# Altium PCB DT10966_MOTOR_CONTROLLER.PcbDoc (part 6 of 8)
Units mm, origin at the board's own origin, x right, y up, seen from the top; angles counter-clockwise.
Board outline 300 x 19 mm, 10 copper layers (Top Layer, Layer 2 GND, Layer 3 SIG, Layer 4 GND, Layer 5 PWR, Layer 6 PWR, Layer 7 GND, Layer 8 SIG, Layer 9 GND, Bottom Layer), stack 2.418 mm thick; 745 components, 446 nets, 2132 pads, 1222 vias.
Unrouted connection lines stored in the file: 3.
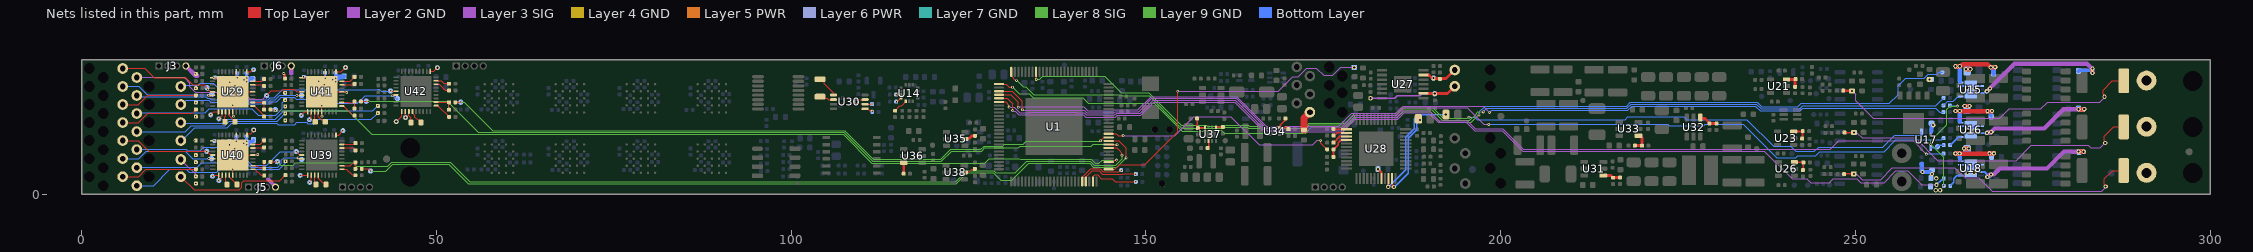
[diagram p13: the nets of this part, all layers, seen from the top]

## Via types
v1: diameter 0.6, hole 0.3, Top Layer to Bottom Layer, tented both sides, 726 vias
v2: diameter 0.4, hole 0.2, Top Layer to Bottom Layer, tented both sides, 493 vias
v3: diameter 0.5, hole 0.2, Top Layer to Bottom Layer, tented both sides, 3 vias

## Nets (pads, with @x,y where several pads share a name; then routed paths per layer and width w, separated by ;. In a path a pad name is that pad's centre, name@x,y a point inside that pad or via, vN(x,y) a via of type N, cw(c..) or ccw(c..) an arc to the next point about the centre after c; other vN are vias at no path point) (continued)
NetR108_2: R108.2 U14.3 | length 0.7
  Top Layer w0.15: v2(114.792,14.056) 114.803,14.045 115.474,14.045 U14.3@115.485,14.035
NetR111_2: R111.2 U14.4 | length 0.8
  Top Layer w0.15: v2(114.842,13.067) 114.89,13.114 115.001,13.114 115.421,13.535 U14.4@115.485,13.535
NetR112_2: R112.2 U14.5 | length 2.1
  Top Layer w0.15: R112.2@114.653,11.785 115.332,12.464 115.564,12.464 116.153,13.053 U14.5@116.153,13.116
NetR114_1: R114.1 R119.1 R124.1 TP6.1 U17.4 | length 17.3
  Layer 8 SIG w0.127: v2(262.429,1.201) 262.429,5.221 v2(260.579,7.07) 260.579,7.573 262.822,9.816 262.822,11.965 263.297,12.44 v2(264.347,12.44)
  Bottom Layer w0.127: R114.1@263.271,12.523 264.19,12.523 264.273,12.44 v2(264.347,12.44)
  Bottom Layer w0.2: U17.4@260.579,6.595 261.366,6.595 261.709,6.938 R119.1@262.41,6.938
NetR114_2: R114.2 U15.6 | length 3
  Bottom Layer w0.127: R114.2@262.371,12.523 262.371,12.528 262.95,13.108 263.732,13.108 264.335,13.711 264.741,13.711 U15.6@264.805,13.774
NetR115_1: R115.1 U1.100 | length 138.7
  Top Layer w0.15: U1.100@131.011,17.262 131.011,16.687 131.585,16.113 131.707,16.113 v2(131.755,16.065)
  Layer 8 SIG w0.15: v2(131.755,16.065) 132.687,15.133 133.055,15.133 134.152,14.035 146.539,14.035 146.663,13.911 150.436,13.911 154.365,9.982 155.028,9.319 160.694,9.319 160.819,9.444 164.303,9.444 164.402,9.344 172.6,9.344 173.033,9.778 178.202,9.778 179.547,11.122 185.322,11.122 186.109,11.909 190.258,11.909 191.748,10.419 195.626,10.419 196.528,11.32 196.528,11.373 196.763,11.608 196.77,11.608 196.78,11.619 197.516,11.619 v2(197.52,11.615)
  Bottom Layer w0.15: v2(197.52,11.615) 198.02,12.114 217.767,12.114 218.376,12.723 235.992,12.723 236.666,12.05 242.112,12.05 242.526,12.464 261.273,12.464 262.129,13.32 262.177,13.32 262.382,13.525 R115.1@262.41,13.525
NetR116_1: R116.1 U15.4 | length 31.3
  Top Layer w0.2: v1(268.491,14.518) 268.526,14.518 268.913,14.906 v1(268.948,14.906)
  Top Layer w0.5: v1(283.369,17.714) 283.373,17.71 283.373,17.101 v1(283.377,17.097)
  Layer 2 GND w0.2: v1(268.491,14.518) 268.526,14.518 268.913,14.906 v1(268.948,14.906)
  Layer 2 GND w0.5: v1(283.369,17.714) 283.373,17.71 283.373,17.101 v1(283.377,17.097)
  Layer 9 GND w0.2: v1(268.491,14.518) 268.526,14.518 268.913,14.906 v1(268.948,14.906)
  Layer 9 GND w0.5: v1(283.369,17.714) 283.373,17.71 283.373,17.101 v1(283.377,17.097)
  Layer 5 PWR w0.2: v1(268.491,14.518) 268.526,14.518 268.913,14.906 v1(268.948,14.906)
  Layer 5 PWR w0.5: v1(283.369,17.714) 283.373,17.71 283.373,17.101 v1(283.377,17.097)
  Layer 6 PWR w0.2: v1(268.491,14.518) 268.526,14.518 268.913,14.906 v1(268.948,14.906)
  Layer 6 PWR w0.5: v1(283.369,17.714) 283.373,17.71 283.373,17.101 v1(283.377,17.097)
  Layer 4 GND w0.2: v1(268.491,14.518) 268.526,14.518 268.913,14.906 v1(268.948,14.906)
  Layer 4 GND w0.5: v1(283.369,17.714) 283.373,17.71 283.373,17.101 v1(283.377,17.097)
  Layer 7 GND w0.2: v1(268.491,14.518) 268.526,14.518 268.913,14.906 v1(268.948,14.906)
  Layer 7 GND w0.5: v1(283.369,17.714) 283.373,17.71 283.373,17.101 v1(283.377,17.097)
  Layer 3 SIG w0.6: v1(268.491,14.518) 268.879,14.906 v1(268.948,14.906) 268.948,14.977 272.38,18.409 282.589,18.409 283.284,17.714 v1(283.369,17.714) ; v1(283.377,17.097) 283.386,17.105 v1@283.386,17.697
  Layer 8 SIG w0.2: v1(268.491,14.518) 268.526,14.518 268.913,14.906 v1(268.948,14.906)
  Layer 8 SIG w0.5: v1(283.369,17.714) 283.373,17.71 283.373,17.101 v1(283.377,17.097)
  Bottom Layer w0.2: U15.4@267.65,14.274 267.677,14.301 268.166,14.301 268.383,14.518 v1(268.491,14.518)
  Bottom Layer w0.5: R116.1@281.406,17.372 281.516,17.482 283.11,17.482 283.342,17.714 v1(283.369,17.714) ; v1@283.369,17.133 v1@283.369,17.482
  Bottom Layer w0.6: v1(268.491,14.518) 268.561,14.518 v1(268.948,14.906)
NetR117_1: R117.1 U1.1 | length 142.2
  Top Layer w0.15: U1.1@129.286,15.537 130.301,15.537 130.751,15.087 v2(131.19,15.087)
  Layer 8 SIG w0.15: v2(131.19,15.087) 131.257,15.087 131.372,14.972 131.376,14.972 132.15,14.197 133.566,14.197 134.129,13.634 135.54,13.634 135.544,13.639 141.062,13.639 141.895,12.805 151.149,12.805 155.079,8.875 158.102,8.875 158.235,9.008 160.633,9.008 161.001,8.64 172.498,8.64 173.359,9.501 178.317,9.501 179.659,10.843 185.434,10.843 186.221,11.63 190.011,11.63 191.499,10.142 195.838,10.142 196.896,11.199 v2(196.926,11.199)
  Bottom Layer w0.15: v2(196.926,11.199) 196.961,11.235 196.961,11.624 197.787,12.45 217.711,12.45 218.262,13 236.114,13 236.787,12.327 241.87,12.327 242.349,12.806 254.73,12.806 255.978,14.054 255.978,15.334 257.033,16.389 259.653,16.389 260.226,16.962 261.499,16.962 261.72,17.183 262.2,17.183 R117.1@262.22,17.204
NetR118_1: R118.1 U15.10 | length 21.6
  Top Layer w0.6: v1(264.06,18.053) 264.064,18.057 264.672,18.057 v1(264.676,18.061) 264.799,18.061 265.088,18.35 268.597,18.35 v1(269.048,17.898) 269.076,17.927 v1(269.659,17.927)
  Layer 2 GND w0.6: v1(264.06,18.053) 264.668,18.053 v1(264.676,18.061) ; v1(269.048,17.898) 269.076,17.927 v1(269.659,17.927)
  Layer 9 GND w0.5: v1(269.048,17.898) 269.062,17.913 269.644,17.913 v1(269.659,17.927)
  Layer 9 GND w0.6: v1(264.06,18.053) 264.067,18.061 v1(264.676,18.061)
  Layer 5 PWR w0.5: v1(269.048,17.898) 269.062,17.913 269.644,17.913 v1(269.659,17.927)
  Layer 5 PWR w0.6: v1(264.06,18.053) 264.067,18.061 v1(264.676,18.061)
  Layer 6 PWR w0.5: v1(269.048,17.898) 269.062,17.913 269.644,17.913 v1(269.659,17.927)
  Layer 6 PWR w0.6: v1(264.06,18.053) 264.668,18.053 v1(264.676,18.061)
  Layer 4 GND w0.5: v1(269.048,17.898) 269.062,17.913 269.644,17.913 v1(269.659,17.927)
  Layer 4 GND w0.6: v1(264.06,18.053) 264.668,18.053 v1(264.676,18.061)
  Layer 7 GND w0.5: v1(269.048,17.898) 269.062,17.913 269.644,17.913 v1(269.659,17.927)
  Layer 7 GND w0.6: v1(264.06,18.053) 264.668,18.053 v1(264.676,18.061)
  Layer 3 SIG w0.5: v1(269.048,17.898) 269.062,17.913 269.644,17.913 v1(269.659,17.927)
  Layer 3 SIG w0.6: v1(264.06,18.053) 264.668,18.053 v1(264.676,18.061)
  Layer 8 SIG w0.5: v1(269.048,17.898) 269.062,17.913 269.644,17.913 v1(269.659,17.927)
  Layer 8 SIG w0.6: v1(264.06,18.053) 264.668,18.053 v1(264.676,18.061)
  Bottom Layer w0.2: U15.10@264.525,15.801 264.552,15.774 U15.10@264.805,15.774
  Bottom Layer w0.5: v1(269.048,17.898) 269.048,17.871 269.329,17.59 269.329,17.164 269.439,17.054 R118.1@269.439,16.999
  Bottom Layer w0.6: v1(264.06,18.053) 264.064,18.057 264.672,18.057 v1(264.676,18.061) 264.676,15.951 ; v1(269.048,17.898) 269.076,17.927 v1(269.659,17.927) 269.499,17.767 269.499,17.059 R118.1@269.439,16.999
NetR119_2: R119.2 U16.6 | length 2
  Bottom Layer w0.2: R119.2@263.31,6.938 264.447,8.075 264.778,8.075 U16.6@264.805,8.102
NetR120_1: R120.1 U1.3 | length 143
  Top Layer w0.15: U1.3@129.286,14.537 131.149,14.537 132.583,13.103 132.583,11.958 v2(132.616,11.925)
  Layer 3 SIG w0.127: v2(132.616,11.925) 132.657,11.884 141.272,11.884 141.682,11.474 145.528,11.474 145.732,11.678 149.001,11.678 150.843,13.52 162.699,13.52 166.864,9.354 177.501,9.354 179.292,11.145 185.293,11.145 185.623,11.476 185.627,11.476 186.323,12.172 195.286,12.172 197.603,9.855 v2(198.295,9.855)
  Bottom Layer w0.15: v2(198.295,9.855) 223.52,9.855 223.729,9.646 228.604,9.646 228.814,9.856 234.168,9.856 238.86,5.164 241.583,5.164 241.829,5.41 244.349,5.41 244.948,6.01 254.011,6.01 255.669,7.667 262.115,7.667 262.372,7.925 R120.1@262.401,7.925
NetR121_1: R121.1 U16.4 | length 29.3
  Top Layer w0.2: v1(268.518,8.642) 268.595,8.719 268.905,8.719 268.992,8.806 v1(269.1,8.806)
  Top Layer w0.6: v1(281.426,11.988) 282.205,11.988 v1(282.222,12.005)
  Layer 2 GND w0.6: v1(268.518,8.642) 268.681,8.806 v1(269.1,8.806) ; v1(281.426,11.988) 282.205,11.988 v1(282.222,12.005)
  Layer 9 GND w0.6: v1(268.518,8.642) 268.937,8.642 v1(269.1,8.806) ; v1(281.426,11.988) 282.205,11.988 v1(282.222,12.005)
  Layer 5 PWR w0.6: v1(268.518,8.642) 268.937,8.642 v1(269.1,8.806) ; v1(281.426,11.988) 281.443,12.005 v1(282.222,12.005)
  Layer 6 PWR w0.6: v1(268.518,8.642) 268.937,8.642 v1(269.1,8.806) ; v1(281.426,11.988) 282.205,11.988 v1(282.222,12.005)
  Layer 4 GND w0.6: v1(268.518,8.642) 268.937,8.642 v1(269.1,8.806) ; v1(281.426,11.988) 282.205,11.988 v1(282.222,12.005)
  Layer 7 GND w0.6: v1(268.518,8.642) 268.681,8.806 v1(269.1,8.806) ; v1(281.426,11.988) 282.205,11.988 v1(282.222,12.005)
  Layer 3 SIG w0.6: v1(268.518,8.642) 268.937,8.642 v1(269.1,8.806) 269.586,9.291 276.577,9.291 279.273,11.988 v1(281.426,11.988) 281.443,12.005 v1(282.222,12.005)
  Layer 8 SIG w0.6: v1(268.518,8.642) 268.937,8.642 v1(269.1,8.806) ; v1(281.426,11.988) 282.205,11.988 v1(282.222,12.005)
  Bottom Layer w0.2: U16.4@267.65,8.602 267.67,8.622 268.498,8.622 v1(268.518,8.642)
  Bottom Layer w0.6: v1(268.518,8.642) 268.937,8.642 v1(269.1,8.806) ; R121.1@281.406,12.13 281.406,12.008 v1(281.426,11.988) ; R121.1@281.413,12.123 281.531,12.005 v1(282.222,12.005)
NetR122_1: R122.1 U1.4 | length 139.6
  Top Layer w0.15: U1.4@129.286,14.037 130.942,14.037 131.973,13.006 131.973,12.303 v2(131.993,12.283)
  Layer 3 SIG w0.127: v2(131.993,12.283) 132.024,12.315 132.453,12.315 ; 132.454,12.315 132.778,12.315 ; 132.779,12.315 141.249,12.315 141.813,11.751 145.441,11.751 145.625,11.935 148.866,11.935 150.706,13.774 162.804,13.774 166.969,9.608 177.169,9.608 178.96,11.399 185.187,11.399 185.518,11.73 185.521,11.73 186.218,12.426 197.517,12.426 v2(198.382,11.56)
  Bottom Layer w0.15: v2(198.382,11.56) 198.449,11.56 198.708,11.819 217.864,11.819 218.491,12.446 235.871,12.446 236.544,11.773 242.227,11.773 242.567,12.113 261.319,12.113 261.847,11.585 R122.1@262.372,11.585
NetR123_1: R123.1 U16.10 | length 19.8
  Top Layer w0.6: v1(264.065,11.76) v1(264.679,11.76) ; v1@264.679,11.742 264.701,11.72 268.582,11.72 v1(268.588,11.726) v1@269.221,11.726
  Layer 2 GND w0.3: v1(268.588,11.726) 268.6,11.738 269.209,11.738 v1(269.221,11.751)
  Layer 2 GND w0.6: v1(264.065,11.76) v1(264.679,11.76)
  Layer 9 GND w0.3: v1(268.588,11.726) 268.6,11.738 269.209,11.738 v1(269.221,11.751)
  Layer 9 GND w0.6: v1(264.065,11.76) v1(264.679,11.76)
  Layer 5 PWR w0.3: v1(268.588,11.726) 268.6,11.738 269.209,11.738 v1(269.221,11.751)
  Layer 5 PWR w0.6: v1(264.065,11.76) v1(264.679,11.76)
  Layer 6 PWR w0.3: v1(268.588,11.726) 268.6,11.738 269.209,11.738 v1(269.221,11.751)
  Layer 6 PWR w0.6: v1(264.065,11.76) v1(264.679,11.76)
  Layer 4 GND w0.3: v1(268.588,11.726) 268.6,11.738 269.209,11.738 v1(269.221,11.751)
  Layer 4 GND w0.6: v1(264.065,11.76) v1(264.679,11.76)
  Layer 7 GND w0.3: v1(268.588,11.726) 268.6,11.738 269.209,11.738 v1(269.221,11.751)
  Layer 7 GND w0.6: v1(264.065,11.76) v1(264.679,11.76)
  Layer 3 SIG w0.3: v1(268.588,11.726) 268.6,11.738 269.209,11.738 v1(269.221,11.751)
  Layer 3 SIG w0.6: v1(264.065,11.76) v1(264.679,11.76)
  Layer 8 SIG w0.3: v1(268.588,11.726) 268.6,11.738 269.209,11.738 v1(269.221,11.751)
  Layer 8 SIG w0.6: v1(264.065,11.76) v1(264.679,11.76)
  Bottom Layer w0.3: v1(269.221,11.751) v1@269.217,11.746 ; v1@269.217,11.746 269.166,11.696 269.166,11.009 R123.1@269.112,10.955 268.92,11.146 268.92,11.458 268.653,11.726 v1(268.588,11.726) 268.608,11.746 v1@269.217,11.746
  Bottom Layer w0.6: v1(264.065,11.76) v1(264.679,11.76) 264.679,10.278
NetR124_2: R124.2 U18.6 | length 2.4
  Bottom Layer w0.2: R124.2@263.329,1.201 263.329,1.206 263.821,1.699 263.821,2.182 264.279,2.639 264.778,2.639 U18.6@264.805,2.666
NetR125_1: R125.1 U1.5 | length 144.9
  Top Layer w0.15: U1.5@129.286,13.537 130.461,13.537 131.201,12.797 v2(131.201,11.798)
  Layer 3 SIG w0.127: v2(131.201,11.798) 131.253,11.745 131.585,11.745 132.103,11.227 141.14,11.227 141.493,10.875 145.654,10.875 145.948,11.17 149.278,11.17 151.121,13.012 162.488,13.012 166.654,8.846 177.711,8.846 179.462,10.596 185.462,10.596 185.834,10.968 185.837,10.968 186.372,11.502 189.802,11.502 191.149,10.155 195.148,10.155 196.316,8.988 200.204,8.988 203.085,6.107 206.316,6.107 ; 206.376,6.107 237.152,6.107 241.083,2.176 243.145,2.176 243.701,1.62 246.266,1.62 246.865,2.219 250.163,2.219 250.722,1.66 254.002,1.66 255.664,3.321 257.309,3.321 259.287,1.344 v1(261.387,1.344)
  Bottom Layer w0.2: v1(261.387,1.344) 262.12,2.077 262.263,2.077 R125.1@262.419,2.234
NetR126_1: R126.1 U18.4 | length 28.7
  Top Layer w0.3: v1(268.559,2.451) 268.64,2.451 268.928,2.739 269.038,2.739 v1(269.096,2.797)
  Top Layer w0.6: v1(281.425,6.018) 281.431,6.011 v1(282.13,6.011)
  Layer 2 GND w0.3: v1(268.559,2.451) 268.64,2.451 268.905,2.717 268.935,2.717 269.015,2.797 v1(269.096,2.797)
  Layer 2 GND w0.6: v1(281.425,6.018) 282.123,6.018 v1(282.13,6.011)
  Layer 9 GND w0.3: v1(268.559,2.451) 268.64,2.451 268.905,2.717 268.935,2.717 269.015,2.797 v1(269.096,2.797)
  Layer 9 GND w0.6: v1(281.425,6.018) 282.123,6.018 v1(282.13,6.011)
  Layer 5 PWR w0.3: v1(268.559,2.451) 268.64,2.451 268.905,2.717 268.935,2.717 269.015,2.797 v1(269.096,2.797)
  Layer 5 PWR w0.6: v1(281.425,6.018) 282.123,6.018 v1(282.13,6.011)
  Layer 6 PWR w0.3: v1(268.559,2.451) 268.64,2.451 268.905,2.717 268.935,2.717 269.015,2.797 v1(269.096,2.797)
  Layer 6 PWR w0.6: v1(281.425,6.018) 281.431,6.011 v1(282.13,6.011)
  Layer 4 GND w0.3: v1(268.559,2.451) 268.64,2.451 268.905,2.717 268.935,2.717 269.015,2.797 v1(269.096,2.797)
  Layer 4 GND w0.6: v1(281.425,6.018) 282.123,6.018 v1(282.13,6.011)
  Layer 7 GND w0.3: v1(268.559,2.451) 268.64,2.451 268.905,2.717 268.935,2.717 269.015,2.797 v1(269.096,2.797)
  Layer 7 GND w0.6: v1(281.425,6.018) 282.123,6.018 v1(282.13,6.011)
  Layer 3 SIG w0.6: v1(268.559,2.451) 268.904,2.797 v1(269.096,2.797) 269.453,2.797 270.297,3.64 276.968,3.64 279.359,6.031 280.547,6.031 280.56,6.018 v1(281.425,6.018) 281.438,6.018 281.444,6.011 v1(282.13,6.011)
  Layer 8 SIG w0.3: v1(268.559,2.451) 268.64,2.451 268.905,2.717 268.935,2.717 269.015,2.797 v1(269.096,2.797)
  Layer 8 SIG w0.6: v1(281.425,6.018) 281.431,6.011 v1(282.13,6.011)
  Bottom Layer w0.3: U18.4@267.906,3.153 268.205,3.153 268.439,2.919 268.439,2.777 268.501,2.715 268.501,2.509 v1(268.559,2.451)
  Bottom Layer w0.6: v1(268.559,2.451) 268.75,2.451 v1(269.096,2.797) ; v1(281.425,6.018) 281.438,6.018 281.444,6.011 v1(282.13,6.011)
NetR127_1: R127.1 U1.6 | length 141.2
  Top Layer w0.15: U1.6@129.286,13.037 U1.6@129.286,13.037 130.215,13.036 130.669,12.582 130.669,12.352 v2(130.717,12.304)
  Layer 3 SIG w0.127: v2(130.717,12.304) 131.419,12.304 132.189,11.534 133.628,11.534 133.631,11.537 140.156,11.537 140.161,11.532 141.264,11.532 141.612,11.185 145.605,11.185 145.843,11.424 149.173,11.424 151.015,13.266 162.593,13.266 166.759,9.1 177.606,9.1 179.397,10.891 185.398,10.891 185.728,11.222 185.732,11.222 186.266,11.756 189.94,11.756 191.287,10.409 195.282,10.409 196.423,9.269 200.282,9.269 203.189,6.362 246.422,6.362 247.592,7.533 258.098,7.533 v2(259.95,5.681)
  Bottom Layer w0.15: v2(259.95,5.681) 259.98,5.711 262.371,5.711 R127.1@262.401,5.741
NetR128_1: R128.1 U18.10 | length 17.8
  Top Layer w0.6: v1(264.046,5.765) 264.056,5.775 v1(264.654,5.775) ; v1@264.654,5.734 265.042,5.734 265.043,5.735 268.804,5.735 v1(268.848,5.78) 269.47,5.78 v1(269.475,5.784)
  Layer 2 GND w0.6: v1(264.046,5.765) 264.056,5.775 v1(264.654,5.775) ; v1(268.848,5.78) 268.853,5.784 v1(269.475,5.784)
  Layer 9 GND w0.6: v1(264.046,5.765) 264.645,5.765 v1(264.654,5.775) ; v1(268.848,5.78) 268.853,5.784 v1(269.475,5.784)
  Layer 5 PWR w0.6: v1(264.046,5.765) 264.056,5.775 v1(264.654,5.775) ; v1(268.848,5.78) 269.47,5.78 v1(269.475,5.784)
  Layer 6 PWR w0.6: v1(264.046,5.765) 264.056,5.775 v1(264.654,5.775) ; v1(268.848,5.78) 268.853,5.784 v1(269.475,5.784)
  Layer 4 GND w0.6: v1(264.046,5.765) 264.056,5.775 v1(264.654,5.775) ; v1(268.848,5.78) 269.47,5.78 v1(269.475,5.784)
  Layer 7 GND w0.6: v1(264.046,5.765) 264.056,5.775 v1(264.654,5.775) ; v1(268.848,5.78) 268.853,5.784 v1(269.475,5.784)
  Layer 3 SIG w0.6: v1(264.046,5.765) 264.056,5.775 v1(264.654,5.775) ; v1(268.848,5.78) 269.47,5.78 v1(269.475,5.784)
  Layer 8 SIG w0.6: v1(264.046,5.765) 264.056,5.775 v1(264.654,5.775) ; v1(268.848,5.78) 268.853,5.784 v1(269.475,5.784)
  Bottom Layer w0.2: U18.10@264.498,4.693 264.525,4.666 U18.10@264.805,4.666
  Bottom Layer w0.6: v1(264.046,5.765) 264.056,5.775 v1(264.654,5.775) ; v1@264.654,5.734 264.654,5.151 264.695,5.11 264.695,4.843 ; v1(268.848,5.78) 269.47,5.78 v1(269.475,5.784)
NetR129_2: R129.2 R130.2 R134.2 X33.1 | length 44.8
  Top Layer w0.15: v1(285.055,13.752) 284.969,13.838 284.969,14.041 284.875,14.135 284.875,14.699 286.182,16.006 R129.2@287.775,16.006
  Top Layer w0.3: R130.2@248.259,14.617 248.28,14.596 249.473,14.596 v1(249.494,14.575)
  Layer 3 SIG w0.15: v1(249.494,14.575) 249.988,14.081 249.988,13.167 252.449,10.705 270.318,10.705 271.667,12.055 276.12,12.055 277.037,12.972 284.426,12.972 284.893,13.439 284.893,13.489 285.055,13.651 v1(285.055,13.752)
NetR139_2: R139.2 R140.2 R143.2 X34.1 | length 44
  Top Layer w0.15: v1(285.172,7.252) 285.172,7.374 285.024,7.523 285.024,8.189 286.34,9.506 R139.2@287.775,9.506
  Top Layer w0.2: R140.2@248.44,8.697 248.455,8.712 249.767,8.712 v1(249.775,8.72) R143.2@249.782,8.727
  Layer 3 SIG w0.15: v1(249.775,8.72) 249.804,8.69 250.187,8.69 250.911,7.966 258.393,7.966 261.599,4.76 272.62,4.76 274.752,6.893 282.762,6.893 283.11,6.545 284.467,6.545 285.172,7.25 v1(285.172,7.252)
NetR141_1: R141.1 R145.2 U21.3 | length 2.5
  Top Layer w0.4: U21.3@240.274,16.203 241.403,16.203 241.549,16.349 R145.2@241.549,16.354 ; R141.1@241.471,15.152 241.471,16.01 241.473,16.013 241.473,16.168 R145.2@241.548,16.243
NetR148_1: R148.1 R151.2 U23.3 | length 2.3
  Top Layer w0.3: U23.3@241.275,8.869 241.289,8.883 R151.2@242.536,8.883 ; R148.1@242.472,7.863 242.511,7.902 242.511,8.858 R151.2@242.536,8.883 ; R151.2@242.55,8.898 R151.2@242.536,8.883
NetR149_2: R149.2 R150.2 R154.2 X35.1 | length 44
  Top Layer w0.15: v1(285.232,1.111) 285.232,1.223 285.031,1.423 285.031,2.195 286.2,3.364 R149.2@287.775,3.364
  Top Layer w0.2: R150.2@248.368,2.859 248.381,2.872 249.715,2.872 R154.2@249.729,2.885 249.776,2.885 v1(249.781,2.88)
  Layer 3 SIG w0.15: v1(249.781,2.88) 249.813,2.847 250.19,2.847 250.943,2.094 253.505,2.094 255.184,3.774 263.967,3.774 265.411,2.33 267.343,2.33 268.167,1.506 268.174,1.506 269.24,0.44 284.698,0.44 285.115,0.857 285.115,0.878 285.232,0.995 v1(285.232,1.111)
NetR156_1: R156.1 R158.2 U26.3 | length 2.4
  Top Layer w0.2: U26.3@241.366,4.539 241.385,4.52 242.622,4.52 R158.2@242.641,4.501 242.602,4.462 242.602,3.462 R156.1@242.563,3.423
NetR163_2: R163.2 U28.44 | length 1.5
  Top Layer w0.3: v1(182.696,3.542) 182.717,3.542 183.182,3.076 U28.44@183.182,2.25
NetR168_2: R168.2 R171.1 U28.28 | length 3.4
  Top Layer w0.2: R171.1@176.428,6.36 177.058,6.991 177.058,7.25 177.428,7.62 178.212,7.62 U28.28@178.262,7.67
  Top Layer w0.3: R168.2@176.428,5.534 R171.1@176.428,6.423
NetR169_2: R169.2 U1.51 | length 44.7
  Top Layer w0.15: U1.51@144.736,3.537 145.623,3.537 146.271,4.184 149.853,4.184 154.478,8.809 v2(154.478,14.529)
  Layer 3 SIG w0.15: v2(154.478,14.529) 154.515,14.566 168.634,14.566 170.652,16.585 171.451,16.585 172.642,17.775 173.999,17.775 175.017,16.757 176.298,16.757 177.435,17.895 v1(179.342,17.895)
NetR171_2: R171.2 U1.61 | length 34.7
  Top Layer w0.15: U1.61@144.736,8.537 145.808,8.537 146.06,8.285 v2(146.778,8.285) ; v2(174.576,7.606) 174.623,7.558 174.623,7.215 175.284,6.554 175.294,6.554 175.499,6.349 R171.2@175.528,6.349
  Layer 3 SIG w0.15: v2(146.778,8.285) 154.027,8.285 156.707,10.965 161.941,10.965 165.948,6.959 173.49,6.959 174.137,7.606 v2(174.576,7.606)
NetR172_1: R172.1 U28.27 | length 2.2
  Top Layer w0.2: R172.1@176.428,7.3 177.299,8.17 U28.27@178.262,8.17
NetR173_1: R173.1 U28.26 | length 2
  Top Layer w0.2: R173.1@176.428,8.163 176.428,8.168 176.93,8.67 U28.26@178.262,8.67
NetR174_1: R174.1 U28.25 | length 1.9
  Top Layer w0.2: R174.1@176.428,9.082 176.516,9.17 U28.25@178.262,9.17
NetR188_1: R188.1 R189.1 U29.29 | length 2.6
  Top Layer w0.15: U29.29@24.12,12.949 25.735,12.949 R189.1@25.735,11.949
NetR189_2: R189.2 TP92.1 U1.53 | length 124.3
  Top Layer w0.127: U1.53@144.736,4.537 145.358,4.537 145.602,4.782 145.805,4.782 v2(145.858,4.834)
  Top Layer w0.15: R189.2@26.635,11.949 26.648,11.936 27.123,11.936 27.249,11.81 v2(27.316,11.81)
  Layer 8 SIG w0.127: v2(27.316,11.81) 27.332,11.794 37.609,11.794 40.929,8.474 107.303,8.474 111.362,4.415 127.267,4.415 127.897,5.044 132.227,5.044 132.356,4.916 142.285,4.916 142.823,4.378 143.37,4.378 143.826,4.834 v2(145.858,4.834)
NetR190_1: R190.1 X13.1 | length 11.1
  Top Layer w0.15: X13.1@5.79,10.121 8.012,10.121 9.328,11.437 15.589,11.437 R190.1@16.11,11.958
NetR191_1: R191.1 U29.28 | length 2.3
  Top Layer w0.15: U29.28@24.12,12.449 24.375,12.449 25.574,11.25 25.574,11.111 R191.1@25.735,10.949
NetR192_1: R192.1 X14.1 | length 10.9
  Top Layer w0.15: X14.1@5.79,12.661 8.026,12.661 9.322,13.958 R192.1@16.11,13.958
NetR193_1: R193.1 U29.35 | length 1.7
  Top Layer w0.15: U29.35@24.12,15.949 25.393,15.949 R193.1@25.706,16.262
NetR194_1: R194.1 U29.34 | length 1.7
  Top Layer w0.15: U29.34@24.12,15.449 25.52,15.449 25.706,15.262 R194.1@25.735,15.262
NetR195_1: R195.1 U29.22 | length 1.7
  Top Layer w0.15: U29.22@20.795,11.624 20.795,11.054 R195.1@21.608,10.241
NetR195_2: R195.2 U29.21 | length 1.4
  Top Layer w0.15: R195.2@20.198,10.241 20.198,10.91 20.295,11.007 U29.21@20.295,11.624
NetR199_1: R199.1 U30.6 | length 1.4
  Top Layer w0.15: U30.6@109.955,12.709 U30.6@110.413,12.709 ; U30.6@110.421,12.717 110.428,12.724 111.372,12.724 v2(111.387,12.739)
NetR200_1: R200.1 U30.5 | length 1.1
  Top Layer w0.15: U30.5@110.413,12.059 110.76,12.059 111.045,11.774 111.363,11.774 v2(111.411,11.726)
NetR201_1: R201.1 X10.1 | length 3.1
  Top Layer w1: R201.1@172.252,9.084 172.252,10.745 X10.1@173.262,11.755
NetR207_2: R207.2 U36.3 | length 1.6
  Top Layer w0.4: R207.2@115.845,2.908 115.852,2.915 115.852,4.452 U36.3@115.859,4.459
NetR210_2: R210.2 U37.1 | length 1
  Top Layer w0.25: U37.1@159.835,9.421 159.835,9.431 159.85,9.446 160.81,9.446 R210.2@160.835,9.471
NetR212_1: R212.1 R214.2 U31.1 | length 2.5
  Top Layer w0.4: U31.1@214.452,2.674 215.498,2.674 215.745,2.427 215.745,2.422 215.82,2.347 R214.2@215.825,2.347 215.841,2.364 216.775,2.364 R212.1@216.792,2.381
NetR213_1: R213.1 R215.2 U32.1 | length 2.7
  Top Layer w0.4: U32.1@228.115,10.837 228.115,10.78 228.215,10.68 228.778,10.68 R215.2@229.489,9.968 ; R215.2@229.475,9.988 R213.1@230.449,9.988
NetR218_1: R218.1 R220.2 U34.6 | length 2.8
  Top Layer w0.25: R218.1@169.525,10.71 169.512,10.696 169.512,10.35 168.948,9.787 168.948,9.433 168.927,9.412 U34.6@168.927,9.408 169.127,9.408 169.86,9.408 170.077,9.192 R220.2@170.079,9.192
NetR219_1: R219.1 R221.2 U33.1 | length 2.8
  Top Layer w0.4: R219.1@218.9,6.882 218.913,6.869 219.881,6.869 R221.2@219.893,6.857 219.893,8.018 219.648,8.264 U33.1@219.398,8.264
NetR222_1: R222.1 U37.6 | length 1
  Top Layer w0.25: R222.1@158.785,6.521 158.835,6.571 U37.6@158.835,7.521
NetR223_1: R223.1 U35.5 | length 1.6
  Top Layer w0.4: U35.5@124.476,7.808 124.581,7.913 125.129,7.913 125.431,8.216 125.873,8.216 R223.1@125.911,8.254
NetR225_2: R225.2 R226.1 U37.4 | length 2.5
  Top Layer w0.25: R225.2@157.195,10.692 157.234,10.654 157.234,10.511 157.234,9.383 157.272,9.344 157.311,9.382 158.32,9.382 158.335,9.397 U37.4@158.335,9.421 ; R225.2@157.281,10.511 R225.2@157.29,10.52
NetR227_1: R227.1 U38.5 | length 1.7
  Top Layer w0.15: U38.5@124.39,3.084 124.406,3.101 125.035,3.101 125.472,3.539 125.852,3.539 R227.1@125.889,3.576
NetR230_1: R230.1 R231.1 U39.29 | length 3
  Top Layer w0.15: U39.29@36.687,4.037 37.849,4.037 38.209,4.397 38.452,4.397 R230.1@38.577,4.522 ; R231.1@38.584,3.63 38.609,3.655 38.609,4.489 R230.1@38.584,4.515
NetR232_1: R232.1 X25.1 | length 16.7
  Top Layer w0.15: X25.1@14,2.501 15.854,0.647 22.22,0.647 22.556,0.983 22.556,1.622 22.859,1.924 27.95,1.924 R232.1@28.738,2.712
NetR233_1: R233.1 U39.28 | length 2.2
  Top Layer w0.15: U39.28@36.687,3.537 37.321,3.537 38.114,2.744 R233.1@38.601,2.744
NetR234_1: R234.1 X26.1 | length 23.1
  Bottom Layer w0.15: X26.1@7.79,1.231 10.164,1.231 12.454,3.521 14.786,3.521 15.16,3.147 19.051,3.147 19.859,3.954 22.952,3.954 23.345,3.562 27.871,3.562 28.681,4.372 28.681,4.454 28.691,4.464 28.691,4.619 v2(28.738,4.667)
NetR235_1: R235.1 U39.35 | length 2
  Top Layer w0.15: U39.35@36.687,7.037 38.407,7.037 38.579,7.21 R235.1@38.608,7.21
NetR236_1: R236.1 U39.34 | length 2
  Top Layer w0.15: U39.34@36.687,6.537 38.252,6.537 38.413,6.376 38.471,6.318 R236.1@38.471,6.21
NetR237_1: R237.1 U39.22 | length 1.9
  Top Layer w0.15: U39.22@33.362,2.712 33.362,2.257 33.98,1.639 34.192,1.639 R237.1@34.43,1.401
NetR237_2: R237.2 U39.21 | length 1.4
  Top Layer w0.15: U39.21@32.862,2.712 32.879,2.695 32.879,1.541 R237.2@33.02,1.401
NetR245_1: R245.1 R246.1 U40.29 | length 2.5
  Top Layer w0.15: U40.29@24.146,4.037 24.164,4.02 24.482,4.02 24.497,4.006 24.727,4.006 24.963,3.77 25.672,3.77 25.74,3.838 25.74,4.556 R246.1@25.695,4.601
NetR247_1: R247.1 X17.1 | length 3.3
  Layer 3 SIG w0.15: X17.1@14,4.913 16.06,2.853 16.06,2.581 v2(16.108,2.533)
NetR248_1: R248.1 U40.28 | length 1.9
  Top Layer w0.15: U40.28@24.146,3.537 24.426,3.537 24.471,3.492 24.506,3.492 25.32,2.678 R248.1@25.708,2.678
NetR249_1: R249.1 X18.1 | length 10.7
  Top Layer w0.15: X18.1@5.79,2.501 8.039,2.501 9.071,3.533 R249.1@16.108,3.533
NetR250_1: R250.1 U40.35 | length 1.8
  Top Layer w0.15: U40.35@24.146,7.037 25.156,7.037 R250.1@25.735,7.616
NetR251_1: R251.1 U40.34 | length 1.6
  Top Layer w0.15: U40.34@24.146,6.537 24.164,6.555 25.674,6.555 R251.1@25.735,6.616
NetR252_1: R252.1 U40.22 | length 1.8
  Top Layer w0.15: U40.22@20.821,2.712 20.821,2.482 21.895,1.409 R252.1@21.895,1.383
NetR252_2: R252.2 U40.21 | length 1.4
  Top Layer w0.15: U40.21@20.321,2.712 20.339,2.695 20.339,1.529 R252.2@20.485,1.383
NetR255_1: R255.1 R256.1 U41.29 | length 2.8
  Top Layer w0.15: U41.29@36.687,12.949 36.689,12.947 37.626,12.947 37.633,12.941 38.326,12.941 R256.1@38.471,13.086 ; R255.1@38.466,12.096 38.468,12.098 R256.1@38.468,13.084
NetR257_1: R257.1 X21.1 | length 22
  Bottom Layer w0.15: X21.1@7.79,8.851 14.644,8.851 15.482,9.689 20.209,9.689 20.848,10.328 27.603,10.328 28.679,11.403 v2(28.703,11.403)
NetR258_1: R258.1 U41.28 | length 2.4
  Top Layer w0.15: U41.28@36.687,12.449 36.942,12.449 38.146,11.245 38.336,11.245 R258.1@38.488,11.093
NetR259_1: R259.1 X22.1 | length 22.9
  Bottom Layer w0.15: X22.1@7.79,11.391 7.934,11.535 17.446,11.535 18.003,12.092 23.957,12.092 24.901,11.147 27.393,11.147 28.303,12.057 28.303,12.885 v2(28.68,13.261)
NetR260_1: R260.1 U41.35 | length 2
  Top Layer w0.15: U41.35@36.687,15.949 37.849,15.949 R260.1@38.471,16.571
NetR261_1: R261.1 U41.34 | length 1.8
  Top Layer w0.15: U41.34@36.687,15.449 36.704,15.466 38.366,15.466 R261.1@38.471,15.571
NetR262_1: R262.1 U41.22 | length 1.9
  Top Layer w0.15: U41.22@33.362,11.624 33.362,10.959 33.804,10.516 34.07,10.516 R262.1@34.345,10.241
NetR262_2: R262.2 U41.21 | length 1.4
  Top Layer w0.15: U41.21@32.862,11.624 32.879,11.607 32.879,10.335 R262.2@32.935,10.28
NetR265_1: R265.1 R266.1 U42.29 | length 2.9
  Top Layer w0.15: U42.29@49.955,13.015 49.973,12.998 51.752,12.998 R266.1@51.771,12.979 51.776,12.974 51.776,11.931 R265.1@51.781,11.926
NetR267_1: R267.1 X29.1 | length 29.7
  Bottom Layer w0.15: X29.1@14,7.581 14.119,7.581 15.95,9.412 20.513,9.412 21.152,10.051 27.478,10.051 27.727,9.802 30.026,9.802 30.357,10.133 31.724,10.133 31.881,9.975 32.749,9.975 33.352,10.578 40.847,10.578 v2(41.718,11.449)
NetR268_1: R268.1 U42.28 | length 2.5
  Top Layer w0.15: U42.28@49.955,12.515 50.21,12.515 51.808,10.917 R268.1@51.808,10.912
NetR269_1: R269.1 X30.1 | length 28.8
  Bottom Layer w0.15: X30.1@14,10.121 14.09,10.031 20.058,10.031 20.632,10.605 27.298,10.605 28.498,11.805 41.055,11.805 v2(41.718,12.469)
NetR270_1: R270.1 U42.35 | length 2
  Top Layer w0.15: U42.35@49.955,16.015 49.973,15.998 50.291,15.998 50.307,15.982 50.671,15.982 51.006,15.647 R270.1@51.802,15.647
NetR271_1: R271.1 U42.34 | length 2.2
  Top Layer w0.15: U42.34@49.955,15.515 50.428,15.515 51.245,14.698 R271.1@51.781,14.698
NetR272_1: R272.1 U42.22 | length 2.1
  Top Layer w0.15: U42.22@46.63,11.69 46.66,11.66 46.66,11.405 46.988,11.077 46.988,10.883 47.316,10.555 47.404,10.555 R272.1@47.835,10.125 R272.1@47.835,10.125
NetR272_2: R272.2 U42.21 | length 1.7
  Top Layer w0.15: U42.21@46.13,11.69 46.13,11.052 46.418,10.765 46.418,10.132 R272.2@46.425,10.125
NetR292_2: R292.2 U1.46 | length 6.8
  Top Layer w0.15: U1.46@141.011,1.812 141.011,2.387 142.203,3.579 143.532,3.579 143.956,3.155 146.182,3.155 146.432,3.405 v2(146.5,3.405)
NetR293_2: R293.2 U1.47 | length 8.2
  Top Layer w0.15: U1.47@141.511,1.812 141.511,2.387 142.426,3.302 143.398,3.302 143.867,2.834 146.667,2.834 146.706,2.873 148.54,2.873 v2(148.555,2.858)
NetR294_2: R294.2 U1.49 | length 7.2
  Top Layer w0.15: U1.49@142.511,1.812 142.511,2.428 142.586,2.503 142.586,2.53 142.804,2.748 143.169,2.748 143.697,2.22 145.22,2.22 145.68,1.76 148.515,1.76 v2(148.528,1.774)
NetTP28_1: TP28.1 U29.1 | length 1.1
  Top Layer w0.15: U29.1@23.295,17.274 23.854,17.274 24.12,17.54 v2@24.242,17.54
  other v2: 24.242,17.547
NetTP29_1: TP29.1 U29.15 X11.1 | length 13.7
  Top Layer w0.15: v2(17.898,13.96) 17.926,13.932 18.452,13.932 U29.15@18.47,13.949
  Bottom Layer w0.15: X11.1@5.79,15.201 8.095,15.201 9.278,14.018 17.663,14.018 17.673,14.008 17.85,14.008 v2(17.898,13.96) 17.946,14.008 18.274,14.008 TP29.1@18.357,14.091
NetTP30_1: TP30.1 U29.14 X12.1 | length 14.4
  Top Layer w0.15: X12.1@5.79,17.741 8.93,17.741 10.261,16.411 14.71,16.411 15.681,15.44 17.344,15.44 17.568,15.215 17.568,15.033 17.777,14.825 v2(17.785,14.825) ; v2@17.833,14.769 17.939,14.769 17.939,14.674 17.956,14.657 17.983,14.657 18.19,14.449 U29.14@18.47,14.449
  Bottom Layer w0.15: TP30.1@17.673,15.034 17.785,14.922 v2(17.785,14.825)
NetTP36_1: TP36.1 U29.19 | length 1.3
  Top Layer w0.15: v3(18.203,11.204) 18.623,11.624 U29.19@19.295,11.624
NetTP37_1: TP37.1 U29.20 | length 1.2
  Top Layer w0.15: v3(19.359,10.639) 19.795,11.074 U29.20@19.795,11.624
NetTP38_1: TP38.1 U30.7 | length 1.3
  Top Layer w0.15: v1(109.189,13.056) 109.31,13.056 109.613,13.359 U30.7@110.413,13.359
NetTP49_1: TP49.1 U39.1 | length 1.2
  Top Layer w0.15: U39.1@35.862,8.362 36.215,8.362 v2(36.834,8.982)
NetTP50_1: TP50.1 U39.15 X23.1 | length 25.6
  Top Layer w0.15: v2(30.518,5.14) 30.562,5.14 30.647,5.055 31.02,5.055 U39.15@31.037,5.037
  Bottom Layer w0.15: X23.1@7.79,3.771 7.843,3.824 16.272,3.824 16.917,4.47 18.081,4.47 18.086,4.464 18.564,4.464 18.57,4.47 23.231,4.47 23.862,3.839 27.631,3.839 28.167,4.375 28.167,4.806 28.53,5.169 30.518,5.169 30.623,5.169 30.715,5.077 TP50.1@30.76,5.032 ; v2(30.518,5.14) 30.562,5.14 30.67,5.032 TP50.1@30.76,5.032 ; TP50.1@31.037,4.917 30.922,5.032 TP50.1@30.76,5.032
NetTP51_1: TP51.1 U39.14 X24.1 | length 25.6
  Top Layer w0.15: v2(30.26,6.032) 30.274,6.032 30.768,5.537 U39.14@31.037,5.537
  Bottom Layer w0.15: X24.1@7.79,6.311 7.843,6.364 14.722,6.364 14.903,6.182 16.759,6.182 17.224,6.647 19.223,6.647 20.989,4.881 23.211,4.881 23.976,4.116 26.079,4.116 27.995,6.032 v2(30.26,6.032)
NetTP57_1: TP57.1 U39.19 | length 1.1
  Top Layer w0.15: v2(30.797,2.674) 31.823,2.674 U39.19@31.862,2.712
NetTP58_1: TP58.1 U39.20 | length 1.1
  Top Layer w0.15: v2(32.154,1.687) 32.154,1.754 32.362,1.962 U39.20@32.362,2.712
NetTP60_1: TP60.1 U40.1 | length 1.4
  Top Layer w0.15: U40.1@23.321,8.362 23.321,8.501 23.363,8.542 23.853,8.542 24.269,8.958 v1(24.269,9.057)
NetTP61_1: TP61.1 U40.15 X15.1 | length 13.4
  Bottom Layer w0.15: X15.1@5.79,5.041 8.062,5.041 9.107,6.087 14.607,6.087 15.652,5.041 17.939,5.041 TP61.1@18.325,5.041
  other v2: 17.939,5.053
NetTP62_1: TP62.1 U40.14 X16.1 | length 13.6
  Top Layer w0.15: X16.1@5.79,7.581 7.98,7.581 9.459,6.102 17.258,6.102 17.302,6.145 17.461,6.145 17.591,6.015 v2(17.659,6.015) ; v2(17.659,6.015) 17.707,5.967 17.811,5.967 18.241,5.537 U40.14@18.496,5.537
NetTP68_1: TP68.1 U40.19 | length 0.9
  Top Layer w0.15: v2(18.462,2.565) 18.529,2.565 18.677,2.712 U40.19@19.321,2.712
NetTP69_1: TP69.1 U40.20 | length 1
  Top Layer w0.15: v2(19.36,1.946) 19.66,2.246 19.66,2.272 19.821,2.433 U40.20@19.821,2.712
NetTP70_1: TP70.1 U41.1 | length 1.6
  Top Layer w0.15: U41.1@35.862,17.274 36.598,17.274 v1(37.21,17.886)
NetTP71_1: TP71.1 U41.15 X19.1 | length 24.7
  Top Layer w0.15: v2(30.34,13.934) 30.348,13.941 31.029,13.941 U41.15@31.037,13.949
  Bottom Layer w0.15: X19.1@7.79,13.931 7.981,13.741 17.548,13.741 17.731,13.558 18.006,13.558 18.246,13.318 22.251,13.318 22.507,13.062 26.431,13.062 26.688,13.319 27.308,13.319 27.929,13.94 30.334,13.94 v2(30.34,13.934) 30.354,13.947 30.99,13.947 TP71.1@31.003,13.961
NetTP72_1: TP72.1 U41.14 X20.1 | length 25.5
  Top Layer w0.15: v2(26.084,13.936) 26.091,13.936 26.722,14.567 28.2,14.567 28.414,14.781 29.992,14.781 30.324,14.449 U41.14@31.037,14.449
  Layer 3 SIG w0.15: X20.1@7.79,16.471 14.446,16.471 15.241,15.677 15.241,15.185 15.87,14.556 16.064,14.362 18.425,14.362 18.428,14.358 22.846,14.358 23.796,13.409 25.57,13.409 v2@26.077,13.916 ; v2@26.078,13.936 v2(26.084,13.936)
NetTP78_1: TP78.1 U41.19 | length 1.1
  Top Layer w0.15: v2(30.964,11.14) 31.448,11.624 U41.19@31.862,11.624
NetTP79_1: TP79.1 U41.20 | length 1.2
  Top Layer w0.15: v2(32.11,10.527) 32.11,10.595 32.362,10.847 U41.20@32.362,11.624
NetTP80_1: TP80.1 U42.1 | length 1.2
  Top Layer w0.15: U42.1@49.13,17.34 49.636,17.34 v1(50.138,17.842)
NetTP81_1: TP81.1 U42.15 X27.1 | length 32.9
  Top Layer w0.15: v2(43.778,13.9) 43.826,13.948 43.959,13.948 44.026,14.015 U42.15@44.305,14.015
  Bottom Layer w0.15: X27.1@14,12.661 14.133,12.661 14.756,13.284 17.613,13.284 17.617,13.281 17.891,13.281 18.19,12.982 21.492,12.982 21.688,12.785 26.546,12.785 26.803,13.042 27.507,13.042 28.128,13.663 29.962,13.663 30.243,13.381 34.315,13.381 34.876,12.821 38.887,12.821 39.966,13.9 v2(43.778,13.9) 43.826,13.852 44.021,13.852 44.365,13.507 TP81.1@44.525,13.507
NetTP82_1: TP82.1 U42.14 X28.1 | length 32.2
  Top Layer w0.15: v2(43.55,14.574) 43.592,14.532 44.288,14.532 U42.14@44.305,14.515
  Bottom Layer w0.15: X28.1@14,15.201 14.159,15.36 16.44,15.36 16.737,15.657 18.561,15.657 20.375,13.843 22.577,13.843 23.081,13.339 26.316,13.339 26.573,13.596 27.145,13.596 28.297,14.748 41.549,14.748 41.636,14.835 41.969,14.835 42.243,14.562 TP82.1@43.538,14.562 ; TP82.1@43.546,14.562 43.546,14.57 v2(43.55,14.574)
NetTP88_1: TP88.1 U42.19 | length 1.8
  Top Layer w0.15: v1(44.339,10.25) 45.13,11.041 U42.19@45.13,11.69
NetTP89_1: TP89.1 U42.20 | length 0.9
  Top Layer w0.15: U42.20@45.63,11.69 45.638,11.682 45.638,10.835 v1(45.646,10.827)
NetU1_93: U1.93 U17.1 | length 134.4
  Top Layer w0.15: U1.93@134.511,17.262 134.52,17.253 134.52,16.213 v2(134.528,16.204)
  Layer 8 SIG w0.15: v2(134.528,16.204) 135.036,16.204 135.474,16.642 144.216,16.642 146.504,14.354 150.386,14.354 154.98,9.76 158.494,9.76 158.658,9.596 160.58,9.596 160.704,9.721 164.417,9.721 164.517,9.621 172.485,9.621 172.919,10.055 178.088,10.055 179.432,11.399 185.207,11.399 185.994,12.186 190.373,12.186 191.863,10.696 195.298,10.696 195.474,10.872 v2(195.511,10.872)
  Bottom Layer w0.15: v2(195.511,10.872) 196.301,10.872 196.616,10.558 196.64,10.558 196.654,10.543 217.512,10.543 217.896,10.927 225.77,10.927 226.168,10.529 234.482,10.529 234.494,10.541 234.679,10.541 238.443,6.778 240.833,6.778 241.556,6.055 244.201,6.055 244.782,6.636 253.83,6.636 255.508,8.313 259.012,8.313 259.094,8.395 259.154,8.395 259.279,8.52 U17.1@259.279,8.795
NetU30_1: U30.1 Y2.1 | length 3.2
  Top Layer w0.15: Y2.1@104.07,16.235 104.371,16.235 104.691,15.914 104.691,15.614 105.963,14.343 U30.1@105.963,14.009
NetU30_2: U30.2 Y2.2 | length 2.1
  Top Layer w0.15: Y2.2@104.07,13.775 104.321,13.523 105.053,13.523 105.218,13.359 U30.2@105.963,13.359
P1: C114.2 U28.46 | length 17
  Top Layer w0.2: v1(184.144,1.059) 184.163,1.078 184.163,2.231 U28.46@184.182,2.25
  Bottom Layer w0.2: v1(184.144,1.059) 184.21,1.059 186.602,3.451 186.602,8.057 187.826,9.282 187.826,10.556 188.517,11.247 v1(192.236,11.247)
P1OUT: C112.1 R161.2 TP21.1 U27.13 X1.1 | length 4.6
  Top Layer w0.4: U27.13@189.629,16.817 189.858,16.817 190.293,16.382 C112.1@190.517,16.382 ; v1(190.517,16.387) 190.586,16.318 192.29,16.318 X1.1@193.5,17.528
P2: C115.2 U28.47 | length 12.3
  Top Layer w0.2: U28.47@184.682,2.25 184.732,2.2 184.732,1.337 184.929,1.141 v1(184.929,1.032)
  Bottom Layer w0.2: v1(184.929,1.032) 184.992,1.032 186.938,2.978 186.938,7.888 188.153,9.104 188.153,10.067 v1(188.59,10.504)
P2OUT: C123.1 R167.2 TP22.1 U27.9 X2.1 | length 13.7
  Top Layer w0.2: U27.9@189.126,14.22 U27.9@189.168,14.178
  Top Layer w0.3: v1(190.695,14.198) 190.695,14.147 C123.1@190.707,14.136
  Top Layer w0.4: U27.9@189.629,14.213 190.61,14.213 190.63,14.192 190.69,14.192 v1(190.695,14.198) 192.472,14.198 X2.1@193.5,15.226
  Layer 3 SIG w0.2: v1@181.706,13.541 185.052,13.541 185.419,13.908 188.576,13.908 188.866,14.198 v1(190.695,14.198)
  other v1: 181.646,13.543
PGND: C73.1 C80.1 C81.1 C88.1 R75.1 R76.1 R77.2 R239.1 R286.2 R287.2 U15.2 U15.9 U15.11 U16.2 U16.9 U16.11 U17.3 U18.2 U18.9 U18.11 | length 28.9
  Top Layer w0.6: v1(265.276,6.462) v1(265.931,6.462) ; v1(265.373,12.447) 266.026,12.447 v1(266.032,12.453) ; v1(265.54,17.623) v1(266.143,17.623)
  Layer 2 GND w0.6: v1(265.276,6.462) v1(265.931,6.462) ; v1(265.373,12.447) 266.026,12.447 v1(266.032,12.453) ; v1(265.54,17.623) v1(266.143,17.623)
  Layer 9 GND w0.6: v1(265.276,6.462) v1(265.931,6.462) ; v1(265.373,12.447) 266.026,12.447 v1(266.032,12.453) ; v1(265.54,17.623) v1(266.143,17.623)
  Layer 5 PWR w0.6: v1(265.276,6.462) v1(265.931,6.462) ; v1(265.373,12.447) 266.026,12.447 v1(266.032,12.453) ; v1(265.54,17.623) v1(266.143,17.623)
  Layer 6 PWR w0.6: v1(265.276,6.462) v1(265.931,6.462) ; v1(265.373,12.447) 266.026,12.447 v1(266.032,12.453) ; v1(265.54,17.623) v1(266.143,17.623)
  Layer 4 GND w0.6: v1(265.276,6.462) v1(265.931,6.462) ; v1(265.373,12.447) 266.026,12.447 v1(266.032,12.453) ; v1(265.54,17.623) v1(266.143,17.623)
  Layer 3 SIG w0.6: v1(265.276,6.462) v1(265.931,6.462) ; v1(265.373,12.447) 266.026,12.447 v1(266.032,12.453) ; v1(265.54,17.623) v1(266.143,17.623)
  Layer 8 SIG w0.6: v1(265.276,6.462) v1(265.931,6.462) ; v1(265.373,12.447) 266.026,12.447 v1(266.032,12.453) ; v1(265.54,17.623) v1(266.143,17.623)
  Bottom Layer w0.2: U18.9@264.805,4.166 265.727,4.166 U18.11@266.227,3.666 266.727,4.166 U18.2@267.65,4.166 ; U16.9@264.805,9.602 265.727,9.602 U16.11@266.227,9.102 266.727,9.602 U16.2@267.65,9.602 ; U15.11@266.227,14.774 266.727,15.274 U15.2@267.65,15.274
  Bottom Layer w0.3: U15.9@264.805,15.274 265.727,15.274 U15.11@266.227,14.774
  Bottom Layer w0.6: C81.1@259.308,4.332 259.308,3.26 v1(259.41,3.159) 260.476,3.159 v1(260.752,2.883) ; U17.3@260.679,8.895 260.679,9.506 v1@260.831,9.657 ; v1@260.711,9.657 v1@260.831,9.657 ; v1(260.924,9.75) v1@260.831,9.657
  other v1: 261.285,0.589 261.91,0.574 261.357,2.259 265.756,3.002 266.679,3.011 265.802,8.957 266.727,8.967 266.78,14.963 265.655,14.967 260.433,16.201
PS_EN_2: R246.2 TP94.1 U1.57 | length 126.9
  Top Layer w0.15: R246.2@26.652,4.588 26.665,4.601 v2(27.647,4.601) ; U1.57@144.736,6.537 145.886,6.537 146.23,6.193 146.61,5.813 146.61,5.535 v2(146.622,5.523)
  Layer 8 SIG w0.15: v2@27.59,4.614 28.068,4.136 29.836,4.136 30.14,4.439 34.208,4.439 34.216,4.431 38.285,4.431 38.744,3.972 43.15,3.972 43.732,4.553 51.947,4.553 54.723,1.777 123.174,1.777 124.692,3.295 128.572,3.295 128.812,3.055 131.601,3.055 133.197,4.651 142.175,4.651 142.713,4.113 145.704,4.113 146.622,5.03 v2(146.622,5.523)
PS_EN_3: R256.2 TP95.1 U1.58 | length 112.3
  Top Layer w0.127: U1.58@144.736,7.037 144.763,7.01 145.898,7.01 v2(145.925,6.983)
  Top Layer w0.15: R256.2@39.371,13.086 39.401,13.117 40.345,13.117 v2(40.376,13.147)
  Layer 8 SIG w0.127: v2(40.376,13.147) 40.426,13.098 51.518,13.098 55.888,8.728 107.434,8.728 111.492,4.669 121.18,4.669 122.609,6.099 126.848,6.099 127.296,6.547 132.022,6.547 132.27,6.794 142.304,6.794 142.554,7.044 145.714,7.044 145.723,7.036 145.873,7.036 v2(145.925,6.983)
PS_EN_4: R231.2 TP93.1 U1.59 | length 116.5
  Top Layer w0.15: R231.2@39.484,3.63 40.391,3.63 v2(40.724,3.297) ; U1.59@144.736,7.537 146.149,7.537 147.194,6.492 v2(147.194,5.144)
  Layer 8 SIG w0.15: v2(40.724,3.297) 40.73,3.29 42.86,3.29 43.846,4.276 51.724,4.276 54.5,1.5 123.289,1.5 124.807,3.018 128.457,3.018 129.446,2.029 129.47,2.029 129.532,1.967 131.066,1.967 133.472,4.374 142.06,4.374 142.598,3.836 145.886,3.836 v2(147.194,5.144)
PS_EN_5: R266.2 TP96.1 U1.60 | length 96.7
  Top Layer w0.127: v2(143.581,7.547) 143.626,7.547 144.116,8.037 U1.60@144.736,8.037
  Top Layer w0.15: R266.2@52.671,12.979 52.69,12.998 53.415,12.998 v2(53.434,13.016)
  Layer 8 SIG w0.127: v2(53.434,13.016) 53.482,12.969 53.941,12.969 57.927,8.982 107.539,8.982 111.598,4.923 121.074,4.923 122.504,6.353 126.742,6.353 127.19,6.801 129.813,6.801 130.06,7.048 132.682,7.048 133.147,7.513 143.546,7.513 v2(143.581,7.547)
PSGND1: C140.1 C141.1 C142.1 C144.1 C145.1 C146.1 C147.1 C148.1 C149.1 J3.4 R187.1 U29.4 U29.10 U29.23 U29.32 U29.37 | length 15.8
  Top Layer w0.15: v2(18.619,16.488) 18.649,16.458 18.739,16.458 18.766,16.432 18.85,16.432 18.958,16.325 19.419,16.325 U29.37@21.295,14.449 21.39,14.544 21.456,14.478 23.811,14.478 23.84,14.449 U29.32@24.12,14.449 ; 21.295,12.249 U29.23@21.295,11.624 21.312,11.607 21.312,11.193 21.43,11.075 v2(21.43,11.007) ; U29.4@21.795,17.274 21.795,16.574 21.801,16.574 v2(21.936,16.439)
  Layer 2 GND w0.6: J3.4@14.705,18.1 16.089,16.716 16.342,16.716
  Bottom Layer w0.4: C145.1@20.903,16.447 20.915,16.435 v2(20.915,15.829) ; C146.1@21.915,17.089 21.915,16.46 v2(21.936,16.439) ; C148.1@23.259,17.08 23.259,16.42 v2(23.284,16.395) ; 23.284,16.165 v2(23.284,16.395) ; R187.1@23.986,16.218 23.986,16.078 23.967,16.059 23.538,16.059 23.353,15.874 23.152,15.874 v2(22.893,16.133) 23.022,16.133 v2(23.284,16.395) ; R187.1@24.146,16.378 23.931,16.378 23.3,16.378 v2(23.284,16.395)
  other v2: 16.06,10.958 21.325,12.58 16.123,12.882 16.12,14.958 21.63,15.315 23.303,15.874 16.034,16.984
PSGND2: C212.1 C213.1 C214.1 C216.1 C217.1 C218.1 C219.1 C220.1 C221.1 J5.4 R244.1 U40.4 U40.10 U40.23 U40.32 U40.37 | length 17
  Top Layer w0.15: U40.23@21.321,2.712 U40.37@21.321,5.537 ; U40.4@21.821,8.362 v2(21.821,7.483) 21.821,6.037 U40.37@21.321,5.537 ; v2(24.84,5.626) 24.772,5.626 24.701,5.555 24.164,5.555 U40.32@24.146,5.537 U40.37@21.321,5.537
  Layer 2 GND w0.5: 26.271,2.156 J5.4@27.343,1.084
  Layer 2 GND w0.6: J5.4@27.343,1.015 J5.4@27.343,1.084
  Bottom Layer w0.4: C217.1@20.848,7.535 20.851,7.532 v2(20.851,6.972) ; v2(22.872,7.227) 23.127,6.972 23.584,6.972 23.771,7.158 ; v2@22.928,7.227 23.184,7.483 24.055,7.483 R244.1@24.215,7.643 ; C220.1@23.237,8.177 23.237,7.483 23.237,7.245 23.684,7.245 23.771,7.158 ; R244.1@24.215,7.657 R244.1@24.215,7.643 ; 23.771,7.158 24.215,7.602 R244.1@24.215,7.643
  Bottom Layer w0.5: v2(21.821,7.483) 21.821,8.173 C218.1@21.826,8.177
  other v2: 16.118,1.533 21.322,3.552 16.118,4.533 16.118,5.533 21.561,6.417 23.267,6.972 23.267,7.483 15.981,7.581 18.671,7.612
PSGND3: C222.1 C223.1 C224.1 C226.1 C227.1 C228.1 C229.1 C230.1 C231.1 J6.4 R254.1 U41.4 U41.10 U41.23 U41.32 U41.37 | length 21.8
  Top Layer w0.15: U41.10@31.037,16.449 31.175,16.449 U41.10@31.176,16.45 ; U41.10@31.176,16.449 U41.10@31.177,16.45 ; v2(31.28,16.582) 31.28,16.553 U41.10@31.177,16.45 ; v2(33.883,11.006) 33.873,11.017 33.873,11.613 U41.23@33.862,11.624 U41.37@33.862,14.449 ; U41.4@34.362,17.274 v2(34.362,16.388) 34.362,14.949 U41.37@33.862,14.449 ; v2(37.371,14.346) 37.303,14.346 37.218,14.432 36.704,14.432 U41.32@36.687,14.449 U41.37@33.862,14.449 ; U41.10@31.177,16.45 31.28,16.45 31.281,16.449 31.862,16.449 U41.37@33.862,14.449
  Top Layer w0.3: v2(28.502,17.037) 28.502,17.01 28.627,16.885 28.627,16.377 C226.1@28.683,16.321
  Layer 2 GND w0.6: 29.55,17.039 J6.4@29.55,18.1
  Bottom Layer w0.3: v2(33.41,15.966) C227.1@33.41,16.426 ; C222.1@34.32,17.158 34.32,16.458 34.362,16.415 v2(34.362,16.388)
  Bottom Layer w0.4: v2(35.421,16.146) v2@35.48,16.146 ; v2(35.824,15.883) 35.744,15.883 v2@35.48,16.146 ; v2(35.831,16.374) 35.603,16.146 v2@35.48,16.146
  Bottom Layer w0.5: C230.1@35.816,17.142 35.816,16.388 v2(35.831,16.374) ; 36.286,16.425 35.824,15.963 v2(35.824,15.883) 35.831,15.889 v2(35.831,16.374) ; 36.499,16.425 36.798,16.425 36.847,16.473 36.902,16.473 37.012,16.583 R254.1@37.012,16.638 36.095,16.638 v2(35.831,16.374)
  other v2: 28.71,10.43 28.713,12.412 33.851,12.512 28.682,14.342 34.21,15.438